# Altium PCB MB_v3.PcbDoc (part 11 of 11)
Units mm, origin at the board's own origin, x right, y up, seen from the top; angles counter-clockwise.
Board outline 203 x 72 mm, 6 copper layers (Top Layer, Layer 3, Layer 1, Layer 2, Layer 4, Bottom Layer), stack 1.52 mm thick; 726 components, 608 nets, 3144 pads, 2508 vias.
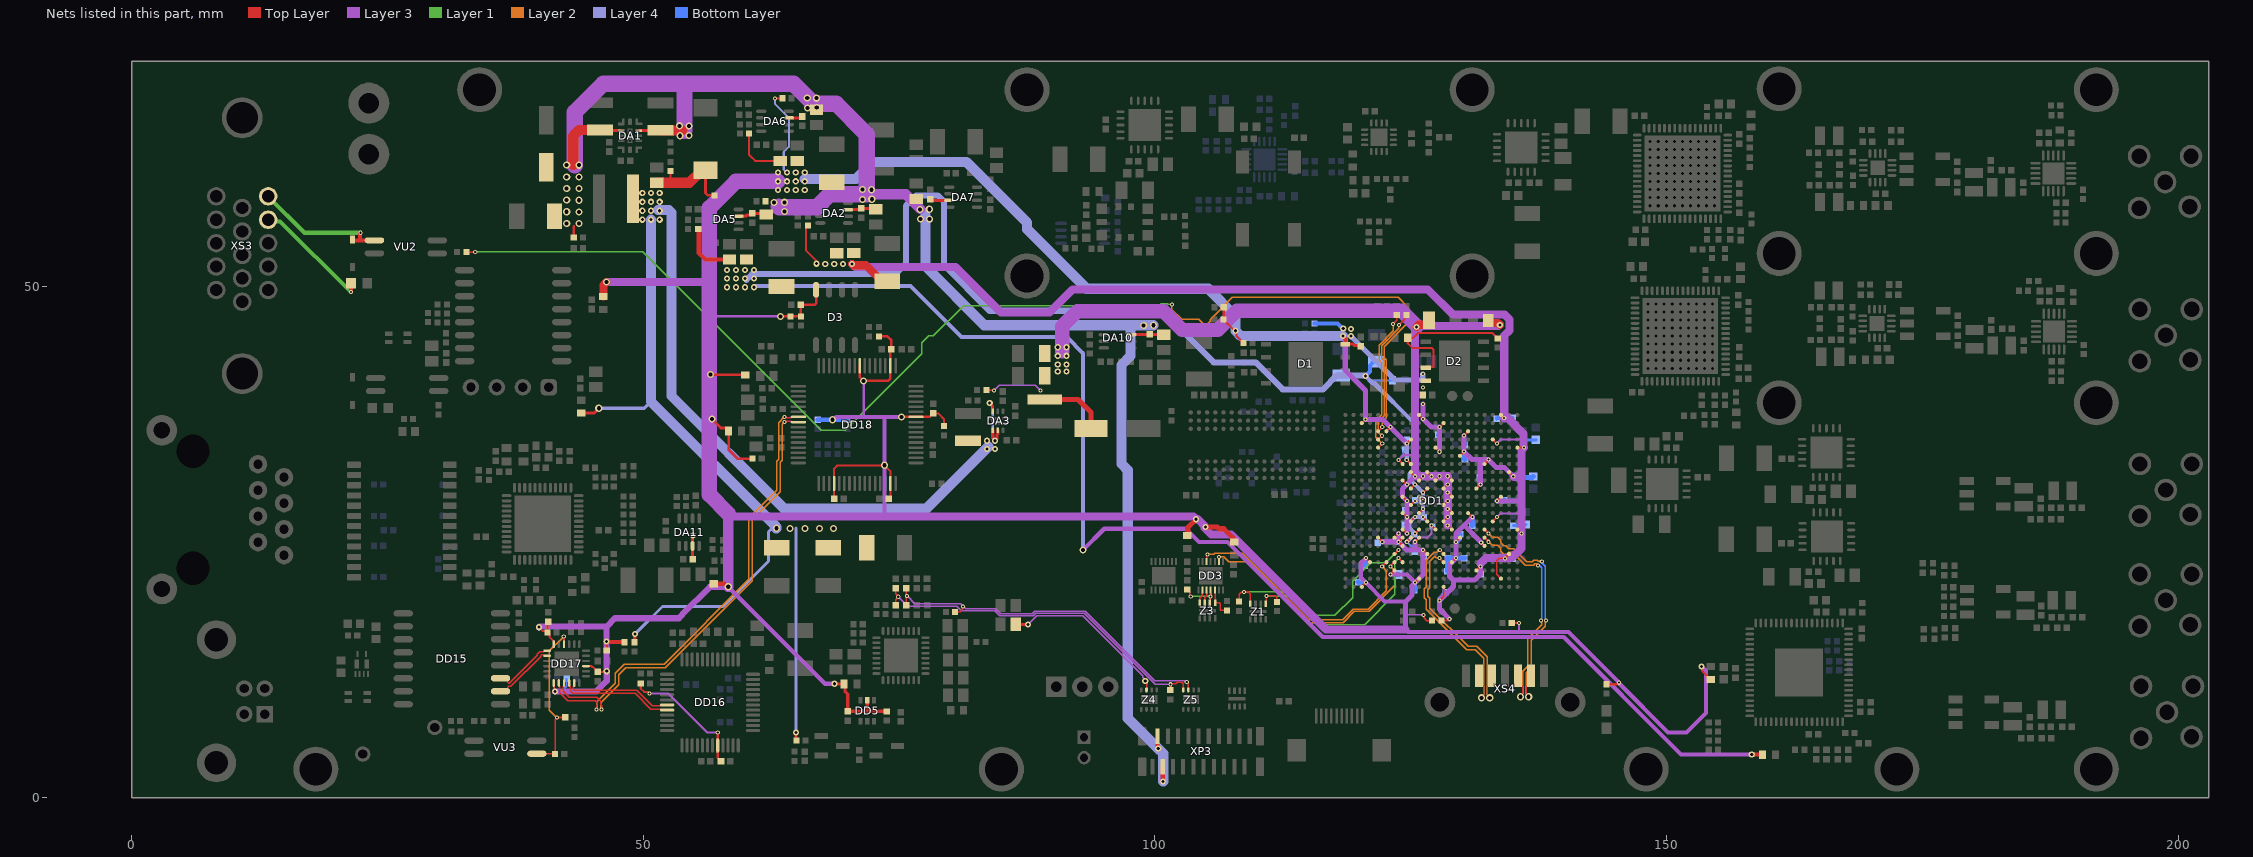
[diagram p13: the nets of this part, all layers, seen from the top]

## Via types
v1: diameter 0.8, hole 0.4, Top Layer to Bottom Layer, tented both sides, 1056 vias
v2: diameter 0.4, hole 0.2, Top Layer to Bottom Layer, tented both sides, 707 vias
v3: diameter 0.6, hole 0.3, Top Layer to Bottom Layer, tented both sides, 364 vias
v4: diameter 0.7, hole 0.4, Top Layer to Bottom Layer, tented both sides, 223 vias
v5: diameter 0.8, hole 0.4, Top Layer to Bottom Layer, 52 vias
v6: diameter 0.9, hole 0.5, Top Layer to Bottom Layer, 45 vias
v7: diameter 0.66, hole 0.4, Top Layer to Bottom Layer, 25 vias
v8: diameter 0.7, hole 0.3, Top Layer to Bottom Layer, 13 vias
v9: diameter 0.5, hole 0.2, Top Layer to Bottom Layer, 12 vias
v10: diameter 0.5, hole 0.3, Top Layer to Bottom Layer, 5 vias
v11: diameter 1, hole 0.5, Top Layer to Bottom Layer, 2 vias
v12: diameter 0.4, hole 0.2, Top Layer to Bottom Layer, 2 vias
v13: diameter 0.9, hole 0.4, Top Layer to Bottom Layer, tented both sides, 2 vias

## Nets (pads, with @x,y where several pads share a name; then routed paths per layer and width w, separated by ;. In a path a pad name is that pad's centre, name@x,y a point inside that pad or via, vN(x,y) a via of type N, cw(c..) or ccw(c..) an arc to the next point about the centre after c; other vN are vias at no path point) (continued)
REGV: C251.2 DD16.8 R10.2 | length 12.7
  Top Layer w0.2: R10.2@49.75,11.175 49.75,10.675 50.075,10.35 50.425,10.35 v2@50.6,10.175 ; v2(57.275,6.375) DD16.8@57.275,5.125 57.275,3.89 C251.2@57.59,3.575
  Layer 3 w0.2: v2(50.6,10.186) 52.464,10.186 56.275,6.375 v2(57.275,6.375)
RHP: C355.1 Z4.3 | length 16.7
  Top Layer w0.125: v3(99.052,11.414) 99.052,11.286 99.175,11.163 Z4.3@99.175,10.55
  Top Layer w0.3: C355.1@86.4,16.95 v3(87.6,16.95)
  Layer 3 w0.125: v3(87.6,16.95) 88.45,17.8 92.944,17.8 98.802,11.942 98.802,11.793 99.052,11.543 v3(99.052,11.414)
RMICN: C345.1 C364.2 R173.2 Z5.4 | length 34.8
  Top Layer w0.125: C364.2@74.675,20.49 74.675,19.961 74.913,19.723 v2(74.913,19.65) 74.913,19.576 74.68,19.343 C345.1@74.68,18.825 ; R173.2@101.5,10.525 101.525,10.55 v2(101.525,11.097) 101.578,11.15 102.025,11.15 102.175,11.3 102.6,11.3 102.775,11.125 Z5.4@102.775,10.55
  Layer 3 w0.125: v2(74.913,19.65) 75.837,18.725 80.618,18.725 81.068,18.275 84.35,18.275 84.837,17.787 88.119,17.787 88.357,18.025 93.095,18.025 100.017,11.103 101.519,11.103 v2(101.525,11.097)
RMICP: C344.1 C363.2 R171.2 Z5.3 | length 34.7
  Top Layer w0.125: C363.2@75.675,20.49 75.675,19.899 75.775,19.799 v2(75.775,19.725) 75.775,19.651 75.696,19.572 C344.1@75.696,18.825 ; R171.2@80.475,18.175 80.95,18.175 81.186,18.411 81.186,18.627 v2(81.239,18.68) ; v2(103.107,11.322) 103.107,11.248 103.275,11.08 Z5.3@103.275,10.55
  Layer 3 w0.125: v2(75.775,19.725) 76.538,18.962 81.029,18.962 81.239,18.752 v2(81.239,18.68) ; v2@81.275,18.716 81.277,18.716 81.494,18.5 84.443,18.5 84.931,18.012 88.026,18.012 88.264,18.25 93.189,18.25 99.979,11.46 102.896,11.46 103.034,11.322 v2(103.107,11.322)
RS422_RX: DD1.W7 DD3.2 | length 24.5
  Top Layer w0.125: DD3.2@106.247,23.095 106.254,23.102 106.254,23.53 v2(106.262,23.538)
  Top Layer w0.2: v2(123.011,22.624) DD1.W7@123.412,23.025
  Layer 2 w0.125: v2(106.262,23.538) 106.725,23.538 107.209,23.055 109.034,23.055 114.964,17.125 118.396,17.125 119.496,18.225 120.925,18.225 123.5,20.8 123.5,22.134 v2(123.011,22.624)
RS422_TX: DD1.W6 DD3.5 | length 25.2
  Top Layer w0.125: DD3.5@105.047,23.095 105.047,23.598 105.15,23.701 v2(105.15,23.775)
  Top Layer w0.2: v2(122.211,22.624) DD1.W6@122.612,23.025
  Layer 2 w0.125: v2(105.15,23.775) 105.175,23.8 105.768,23.8 105.868,23.9 108.535,23.9 115.047,17.388 118.341,17.388 119.403,18.45 120.825,18.45 122.625,20.25 122.625,22.209 v2(122.211,22.624)
RS422A: DD3.12 R35.1 Z3.5 | length 3
  Top Layer w0.125: DD3.12@105.847,20.305 105.875,20.277 Z3.5@105.875,19.065 106.268,19.065 106.375,18.958 106.375,18.4 106.45,18.325 R35.1@107.025,18.325
RS422B: DD3.11 R36.2 Z3.6 | length 4
  Top Layer w0.125: R36.2@103.161,20.361 103.398,20.124 103.398,19.864 103.5,19.762 v2(103.5,19.688) ; Z3.6@105.375,19.065 105.4,19.09 105.4,19.663 v2(105.425,19.688) ; v2@105.436,19.688 105.436,20.294 DD3.11@105.447,20.305
  Layer 1 w0.125: v2(103.5,19.688) v2(105.425,19.688)
RS422Y: DD3.9 Z3.8 | length 1.4
  Top Layer w0.125: Z3.8@104.375,19.065 104.394,19.084 104.394,19.494 104.647,19.747 DD3.9@104.647,20.305
RS422Z: DD3.10 Z3.7 | length 1.3
  Top Layer w0.125: Z3.7@104.875,19.065 104.875,19.554 105.047,19.726 DD3.10@105.047,20.305
SERCLK_N: DD1.T18 XS4.5 | length 23
  Top Layer w0.125: XS4.5@135.49,11.95 135.49,11.25 135.828,10.912 135.889,10.912 135.963,10.839 135.963,10.236 135.725,9.998 v4(135.725,9.875)
  Top Layer w0.2: DD1.T18@132.212,25.425 v2(132.613,25.024)
  Layer 2 w0.125: v2(132.613,25.024) 132.976,24.661 133.489,24.661 133.782,24.368 133.782,24.106 134.075,23.812 134.375,23.812 134.577,24.015 134.938,24.015 136.203,22.75 137.01,22.75 137.136,22.876 137.239,22.876 137.39,22.725 v2(137.45,22.725) ; v4(135.725,9.875) 135.725,9.998 135.963,10.236 135.963,12.373 136.45,12.861 136.45,15.55 137.813,16.912 137.813,17.176 137.725,17.263 v2(137.725,17.337)
  Bottom Layer w0.125: v2(137.45,22.725) 137.503,22.672 137.626,22.672 137.813,22.486 137.813,19.951 v2@137.813,17.499
SERCLK_P: DD1.R18 XS4.6 | length 23.6
  Top Layer w0.125: v4(136.525,9.875) 136.525,9.998 136.288,10.236 136.288,10.839 136.361,10.912 136.423,10.912 136.76,11.25 XS4.6@136.76,11.95
  Top Layer w0.2: DD1.R18@132.212,26.225 v2(132.613,25.824)
  Layer 2 w0.125: v2(132.613,25.824) 132.979,25.458 133.489,25.458 133.792,25.155 133.792,24.936 134.09,24.638 134.275,24.638 134.573,24.34 135.073,24.34 136.337,23.075 136.875,23.075 137.001,23.201 137.374,23.201 137.444,23.131 137.751,23.131 v2(137.804,23.079) ; v4(136.525,9.875) 136.525,9.998 136.288,10.236 136.288,12.239 136.775,12.727 136.775,15.415 138.138,16.778 138.138,17.176 138.225,17.263 v2(138.225,17.337)
  Bottom Layer w0.125: v2(137.804,23.079) 137.856,23.026 137.856,22.902 138.138,22.621 138.138,19.817 v2@138.138,17.499
SERDATA_N: DD1.W13 XS4.3 | length 20.7
  Top Layer w0.125: v4(132.715,9.775) 132.715,9.898 132.477,10.136 132.477,10.839 132.551,10.912 132.613,10.912 132.95,11.25 XS4.3@132.95,11.95
  Top Layer w0.2: v2(127.811,23.426) DD1.W13@128.212,23.025
  Layer 2 w0.125: v2(127.811,23.426) 127.758,23.479 127.494,23.479 127.36,23.612 126.85,23.102 126.85,20.514 126.652,20.316 126.652,19.694 126.85,19.497 126.85,18.55 130.6,14.8 131.46,14.8 132.477,13.782 132.477,10.136 132.715,9.898 v4(132.715,9.775)
SERDATA_P: DD1.V13 XS4.2 | length 21.3
  Top Layer w0.125: XS4.2@131.68,11.95 131.68,11.25 132.018,10.912 132.079,10.912 132.152,10.839 132.152,10.136 131.915,9.898 v4(131.915,9.775)
  Top Layer w0.2: v2(127.837,24.226) 127.837,24.213 128.212,23.838 DD1.V13@128.212,23.825
  Layer 2 w0.125: v2(127.837,24.226) 127.763,24.226 127.533,23.997 127.285,23.997 126.525,23.237 126.525,20.648 126.327,20.45 126.327,19.56 126.525,19.362 126.525,18.415 130.465,14.475 131.325,14.475 132.152,13.648 132.152,10.136 131.915,9.898 v4(131.915,9.775)
TUNE: DD1.C5 R39.1 | length 121.2
  Top Layer w0.125: R39.1@32.708,53.34 33.565,53.34 v2(33.575,53.35)
  Top Layer w0.2: DD1.C5@121.812,35.825 v2(122.213,36.226)
  Layer 1 w0.125: v2(33.575,53.35) 49.963,53.35 67.388,35.925 69.75,35.925 77.2,43.375 77.2,44.456 77.882,45.138 78.353,45.138 81.323,48.108 100.445,48.108 100.613,48.275 101.213,48.275 101.267,48.221 v2(101.663,48.221)
  Layer 2 w0.125: v2(101.663,48.221) 101.65,48.208 101.65,47.719 102.595,46.775 104.3,46.775 104.787,46.287 105.117,46.287 105.388,46.558 105.388,46.744 107.544,48.9 123.757,48.9 124.713,47.944 124.713,46.418 122.387,44.093 122.387,43.032 122.625,42.794 122.625,37.15 122.213,36.738 v2(122.213,36.226)
TUNE_OUT_N: DA9.2 VU2.3 XS3.5 | length 13.4
  Top Layer w0.4: DA9.2@21.59,54.563 21.59,54.533 21.64,54.483 22.3,54.483 ; v2(22.35,55.225) 22.3,55.175 22.3,54.483 ; VU2.3@23.722,54.483 22.3,54.483
  Layer 1 w0.4: XS3.5@13.343,58.785 16.903,55.225 v2(22.35,55.225)
TUNE_OUT_P: F3.1 XS3.4 | length 11.9
  Top Layer w0.4: v2(21.425,49.425) 21.425,50.282 F3.1@21.435,50.292
  Layer 1 w0.4: XS3.4@13.343,56.495 13.498,56.34 14.51,56.34 v2(21.425,49.425)
TX_FAIL: DD1.V7 R30.2 Z1.8 | length 23.2
  Top Layer w0.125: R30.2@108.225,19.175 108.225,19.904 108.424,20.103 108.678,20.103 v2(108.7,20.125) 109.125,20.125 109.325,19.925 Z1.8@109.325,18.975
  Top Layer w0.2: DD1.V7@123.412,23.825 v2(123.813,24.226)
  Layer 1 w0.125: v2(108.7,20.125) 113.35,20.125 115.637,17.838 117.588,17.838 119.315,19.565 119.315,21.19 121.111,22.986 122.573,22.986 v2(123.813,24.226)
TX_ON: DD1.W8 R29.2 Z1.5 | length 21.6
  Top Layer w0.125: Z1.5@110.825,18.975 110.868,19.018 110.868,19.668 v2(110.911,19.711) v2@110.925,19.725 ; v2@111.025,19.825 v2@110.925,19.725 ; R29.2@111.925,19.15 111.925,19.6 111.753,19.772 111.415,19.772 111.368,19.725 v2@110.925,19.725
  Top Layer w0.2: v2(123.811,23.426) DD1.W8@124.212,23.025
  Layer 1 w0.125: v2(110.911,19.711) 113.324,19.711 116.107,16.928 120.488,16.928 123.448,19.888 123.448,23.064 v2(123.811,23.426)
USBD1_N: DD17.2 DD18.7 | length 45.6
  Top Layer w0.125: DD17.2@41.75,11.225 41.75,10.932 41.837,10.844 41.837,10.29 42.628,9.5 45.307,9.5 45.513,9.294 45.513,9.096 45.425,9.009 v2(45.425,8.65) ; v2(63.8,37.225) 63.874,37.225 63.962,37.138 64.404,37.138 64.491,37.225 DD18.7@65.15,37.225
  Layer 2 w0.125: v2(45.425,8.65) 45.425,8.724 45.513,8.812 45.513,9.441 47.275,11.203 47.275,12.185 48.14,13.05 52.025,13.05 60.325,21.35 60.325,27.325 63.037,30.037 63.037,32.913 63.238,33.113 63.238,36.675 63.787,37.225 v2(63.8,37.225)
USBD1_P: DD17.3 DD18.8 | length 45
  Top Layer w0.125: DD17.3@42.25,11.225 42.25,10.932 42.162,10.844 42.162,10.425 42.763,9.825 45.441,9.825 45.838,9.429 45.838,9.096 45.925,9.009 v2(45.925,8.65) ; v2(63.8,36.725) 63.874,36.725 63.962,36.812 64.404,36.812 64.491,36.725 DD18.8@65.15,36.725
  Layer 2 w0.125: v2(45.925,8.65) 45.925,8.724 45.838,8.812 45.838,9.306 47.6,11.069 47.6,12.05 48.275,12.725 52.16,12.725 60.65,21.215 60.65,27.19 63.362,29.903 63.362,32.778 63.563,32.978 63.563,36.518 63.769,36.725 v2(63.8,36.725)
USBD2_N: DD16.44 DD17.4 | length 11.1
  Top Layer w0.125: DD17.4@42.75,11.225 42.75,10.932 42.837,10.844 42.837,10.461 43.101,10.197 49.203,10.197 50.738,8.663 51.64,8.663 51.728,8.575 DD16.44@52.325,8.575
USBD2_P: DD16.43 DD17.5 | length 10.5
  Top Layer w0.125: DD17.5@43.25,11.225 43.25,10.932 43.162,10.844 43.162,10.595 43.236,10.522 49.338,10.522 50.872,8.988 51.64,8.988 51.728,9.075 DD16.43@52.325,9.075
USBD_N: DD15.11 DD17.19 | length 6.2
  Top Layer w0.125: DD15.11@36.043,11.684 36.514,11.684 36.733,11.465 36.733,11.285 36.806,11.211 36.91,11.211 39.634,13.936 39.634,14.024 39.898,14.287 40.219,14.287 40.307,14.375 DD17.19@40.6,14.375
USBD_P: DD15.10 DD17.20 | length 6.4
  Top Layer w0.125: DD15.10@36.043,10.414 DD15.10@36.514,10.414 ; DD15.10@36.703,10.414 DD15.10@36.514,10.414 ; DD17.20@40.6,13.875 40.307,13.875 40.219,13.962 40.032,13.962 39.959,13.889 39.959,13.801 37.045,10.886 36.806,10.886 36.733,10.813 36.733,10.633 DD15.10@36.514,10.414
VBUS_ISO: DD17.16 R168.2 R204.1 VU3.3 | length 15.8
  Top Layer w0.125: VU3.3@39.6,4.315 41.375,4.315 R168.2@41.375,4.3 41.405,4.33 41.405,7.639 41.575,7.81 v2(41.575,7.85)
  Top Layer w0.2: v2(41.575,7.85) 42.35,7.85 R204.1@42.375,7.875 ; v2(42.225,15.75) 42.244,15.731 42.244,15.031 DD17.16@42.25,15.025
  Layer 2 w0.125: v2(41.575,7.85) 41.55,7.85 40.825,8.575 40.825,14.35 v2(42.225,15.75)
VCC_5V0: C128.2 DA11.3 | length 2.4
  Top Layer w0.3: C128.2@54.816,23.299 54.812,23.303 54.812,24.612 DA11.3@54.808,24.616 54.818,24.626 54.818,25.618 v3(54.85,25.65)
VCC_12V0: C1.2 C2.1 C8.2 C9.2 C10.2 C11.2 C15.2 C16.2 C17.2 C72.2 C73.2 C87.2 C88.2 DA1.2 DA1.10 DA2.3 DA5.3 DA6.3 DA7.3 DA10.3 L58.2 R2.2 R182.1 XP3.2 XP3.3 | length 166.5
  Top Layer w0.2: R182.1@43.2,54.75 43.2,55.9
  Top Layer w0.3: C73.2@45.775,65.275 45.85,65.2 DA1.2@47.83,65.2 ; DA1.10@49.57,65.2 51.625,65.2 C72.2@51.675,65.25 ; DA5.3@59.308,56.849 59.647,56.849 59.673,56.875 60.057,56.875 60.123,56.941 60.455,56.941 C15.2@60.625,57.111 61.931,57.111 C8.2@62.022,57.02 ; R2.2@61.922,58.265 R2.2@61.957,58.3 ; DA6.3@64.22,66.447 65.4,66.447 C16.2@65.537,66.584 ; DA2.3@70,57.476 71.182,57.476 C11.2@71.317,57.611 72.623,57.611 C1.2@72.714,57.52 ; C17.2@78.06,58.493 78.16,58.393 79.896,58.393 DA7.3@79.905,58.383 ; DA10.3@97.698,45.266 97.708,45.276 99.455,45.276 C88.2@99.476,45.297 100.83,45.297 C87.2@100.873,45.254
  Top Layer w0.4: XP3.2@100.261,6.034 100.261,4.924 100.323,4.863 v3(100.323,4.809) ; XP3.3@100.761,3.034 100.761,1.693 100.8,1.654 v3(100.8,1.6)
  Top Layer w1: 43.148,61.85 43.148,64.689 43.734,65.275 C73.2@45.775,65.275 ; C72.2@51.675,65.25 51.7,65.225 53.775,65.225
  Layer 3 w1: 63.232,57.775 63.382,57.775 ; 72.307,58.975 75.65,58.975 v4@77.087,57.537
  Layer 3 w1.6: 43.3,61.836 43.3,67 46.075,69.775 54.025,69.775 ; 54.025,65.2 54.025,69.775 ; 63.232,57.775 63.282,57.725 66.975,57.725 68.225,58.975 71.807,58.975 71.821,58.989 71.821,64.854 68.85,67.825 66.5,67.825 66.5,67.95 64.675,69.775 54.025,69.775
  Layer 4 w1: 77.585,56.95 77.585,51.93 83.327,46.187 97.475,46.187 ; v4(99.85,46.187) 97.475,46.187 ; v3(100.8,1.6) 100.8,4.331 v3(100.323,4.809) 97.35,7.781 97.35,32.025 96.73,32.645 96.73,42.303 97.603,43.175 97.603,46.06 97.475,46.187
  other v4: 98.9,46.175 42.512,56.134 43.7,56.123 77.975,56.55 77.075,56.575 43.7,57.261 42.512,57.272 63.782,57.3 77.05,57.5 77.95,57.525 62.782,58.175 63.807,58.2 43.7,58.4 42.512,58.411 71.432,58.475 72.332,58.5 72.307,59.425 71.407,59.45 42.512,59.55 43.7,59.539 42.512,60.688 43.7,60.677 42.512,61.836 43.7,61.825 53.575,64.7 54.475,64.725 54.45,65.65 53.55,65.675 66.05,67.425 66.95,67.45 66.925,68.375 66.025,68.4
VDD_1V0: C19.2 C25.1 C42.2 C45.2 C47.2 C49.2 C51.2 C53.2 C55.2 C56.2 C60.2 C61.2 C63.2 DD1.G8 DD1.H9 DD1.H11 DD1.J8 DD1.J10 DD1.J12 DD1.J14 DD1.K13 DD1.L8 DD1.L14 DD1.M13 DD1.N8 DD1.N14 DD1.P13 DD1.R8 DD1.R14 L67.2 R4.1 | length 106.2
  Top Layer w0.125: R4.1@83.525,39.85 83.55,39.825 v2(84.275,39.825)
  Top Layer w0.2: v2(123.811,33.026) DD1.G8@124.212,32.625 ; DD1.R8@124.212,26.225 v2(124.613,25.824) ; DD1.N8@124.212,27.825 v2(124.613,27.424) ; DD1.L8@124.212,29.425 v2(124.613,29.024) ; DD1.J8@124.212,31.025 v2(124.613,30.624) ; DD1.H9@125.012,31.825 v2(125.413,31.424) ; DD1.J10@125.812,31.025 v2(126.213,31.426) ; DD1.H11@126.612,31.825 v2(127.013,31.424) ; DD1.J12@127.412,31.025 v2(127.813,31.426) ; DD1.P13@128.212,27.025 v2(128.613,27.426) ; DD1.M13@128.212,28.625 v2(128.613,29.026) ; DD1.K13@128.212,30.225 v2(128.613,30.626) ; v2(128.611,26.626) DD1.R14@129.012,26.225 ; v2(128.611,28.226) DD1.N14@129.012,27.825 ; v2(128.611,29.826) DD1.L14@129.012,29.425 ; v2(128.611,31.426) DD1.J14@129.012,31.025
  Top Layer w0.5: L67.2@89.225,38.935 92.49,38.935 93.75,37.675 C25.1@93.75,36.1
  Top Layer w0.8: v3(125.576,46.024) 125.777,46.225 126.6,46.225 126.775,46.4 C45.2@126.775,46.675 ; C49.2@132.575,46.65 132.575,46.5 132.675,46.4 133.525,46.4 v3(133.7,46.225)
  Layer 3 w0.125: v2(84.275,39.825) 84.788,40.338 88.287,40.338 v2(88.8,39.825)
  Layer 3 w0.2: v2(123.811,33.026) 123.813,33.026 124.287,33.5 125.223,33.5 125.413,33.31
  Layer 3 w0.5: v2(124.613,25.824) v2(124.613,27.424) v2(124.613,29.024) 124.175,29.462 124.175,30.185 v2(124.613,30.624) v2(125.413,31.424)
  Layer 3 w0.6: v2@128.611,29.024 v2(128.613,29.026) ; v2(128.611,31.426) v2@128.613,31.424
  Layer 3 w0.8: 125.4,38.2 125.4,45.848 v3(125.576,46.024) ; 125.413,38.187 125.413,33.31 v2(125.413,31.424) v2@126.211,31.424 ; v3@125.576,46.101 133.576,46.101 v3(133.7,46.225) ; v2@126.216,31.424 v2(127.013,31.424) ; v2@127.013,31.426 v2(127.813,31.426) v2(128.611,31.426) ; v2(128.611,26.626) v2(128.611,28.226) v2@128.611,29.024 ; v2(128.613,29.026) v2(128.613,30.626) v2@128.613,31.424
  Layer 3 w1.4: 90.95,43.65 90.95,46.075 92.425,47.55 100.838,47.55 102.663,45.725 106.15,45.725 108.013,47.588 124.088,47.588 v3@125.576,46.101
  Bottom Layer w0.2: v2(123.811,33.026) 124.305,33.521 124.305,33.815 C63.2@124.49,34
  Bottom Layer w0.3: C60.2@124.49,28.215 124.613,28.092 v2(124.613,27.424) ; C56.2@124.494,26.65 124.613,26.531 v2(124.613,25.824)
  other v3: 90.5,41.662 91.35,41.662 90.5,42.362 91.35,42.362 90.5,43.2 91.35,43.2 90.5,44.037 91.35,44.037
VDD_1V8: C33.2 C39.2 C48.2 C50.2 C57.2 C59.2 C62.2 C64.2 DD1.K9 DD1.K11 DD1.L10 DD1.M9 DD1.N10 DD1.P9 DD1.P11 DD1.R10 DD1.T9 L4.2 L8.1 L46.1 R13.2 | length 250.3
  Top Layer w0.2: v2(124.611,25.024) DD1.T9@125.012,25.425 ; DD1.P9@125.012,27.025 v2(125.413,27.426) ; DD1.M9@125.012,28.625 v2(125.413,29.026) ; DD1.K9@125.012,30.225 v2(125.413,30.626) ; v2(125.411,25.824) DD1.R10@125.812,26.225 ; DD1.N10@125.812,27.825 v2(126.213,28.226) ; DD1.L10@125.812,29.425 v2(126.213,29.024) ; v2(126.211,27.426) DD1.P11@126.612,27.025 ; v2(126.212,29.825) DD1.K11@126.612,30.225 DD1.K11@126.613,30.226
  Top Layer w0.4: R13.2@55.418,55.312 55.418,53.264 56.083,52.599 C39.2@58.427,52.599 ; v3(158.326,4.225) L46.1@159.375,4.225
  Layer 3 w0.4: v4(92.975,24.225) 95.045,26.295 103.005,26.295 104.3,25 107.1,25 116.4,15.7 139.95,15.7 151.425,4.225 v3(158.326,4.225)
  Layer 4 w0.2: v2(125.413,29.026) v2@125.415,29.025 ; v2(126.211,27.426) v2@126.212,27.428 ; v2@126.212,28.225 v2(126.213,28.226)
  Layer 4 w0.4: v3(60.807,49.9) 60.932,50.025 76.1,50.025 81.098,45.027 91.393,45.027 92.975,43.444 v4(92.975,24.225) ; v3(120.58,41.219) 121.282,40.517 121.433,40.517 125.275,36.675 125.275,32.075 124.875,31.675 124.875,31.165 v2(125.413,30.626) 126.212,29.828 v2(126.212,29.825) v2(126.213,29.024) ; v2(124.611,25.024) v2(125.411,25.824) 124.869,26.365 124.869,26.891 v2@125.404,27.426 ; v2(125.413,27.426) v2@125.404,27.426 ; v2@125.415,29.025 v2(126.213,29.024) ; v2(126.211,27.426) v2@125.404,27.426 ; v2@126.212,27.428 v2@126.212,28.225 ; v2(126.213,28.226) v2(126.213,29.024) v2(126.213,29.024)
  Layer 4 w0.6: v3@60.082,50.613 60.653,51.183 74.633,51.183 75.654,52.204 75.654,57.849 76.675,58.869 78.76,58.869 79.4,58.23 79.4,52.025 83.825,47.6 100.69,47.6 105.74,42.55 109.843,42.55 112.483,39.91 116.425,39.91 117.79,41.275 120.524,41.275 v3(120.58,41.219)
  Bottom Layer w0.2: v3(120.58,41.219) 120.642,41.219 121.035,40.826 121.177,40.826 121.203,40.8 L8.1@123.195,40.8 ; v2(124.611,25.024) 125.011,24.624 125.293,24.624 125.411,24.506 125.411,24.08 C62.2@125.402,24.072
  Bottom Layer w0.4: C50.2@118.2,41.275 118.228,41.247 120.552,41.247 v3(120.58,41.219) ; v3@120.58,41.275 120.621,41.275 121,41.654 121,42.25 121.375,42.625 C48.2@121.65,42.625
  other v3: 58.182,49.9 59.057,49.9 59.932,49.9 58.182,50.75 59.057,50.75 59.932,50.75 60.807,50.75 58.182,51.6 59.057,51.6 59.932,51.6 60.807,51.6
VDD_2V5: C30.2 C36.2 C134.2 C135.2 C138.2 C139.2 C142.2 C143.2 C145.2 C147.2 C148.2 C149.2 C150.2 C151.2 C152.2 C153.2 C154.2 C156.2 C157.2 C158.2 C159.2 C160.2 C161.2 DD1.A20 DD1.AA20 DD1.AB13 DD1.C16 DD1.D19 DD1.E22 DD1.F15 DD1.G18 DD1.H21 DD1.K17 DD1.L20 DD1.N16 DD1.P19 DD1.R22 DD1.T15 DD1.U18 DD1.V21 DD1.W14 DD1.Y17 L1.2 R7.2 R61.2 | length 175.2
  Top Layer w0.125: v2(127.817,19.292) 128.212,19.687 DD1.AB13@128.212,20.625 ; DD1.AA20@133.807,21.425 133.4,21.832 133.4,23.161 133.651,23.413 134.197,23.413 v2(134.211,23.399)
  Top Layer w0.2: R7.2@66.11,55.939 65.91,55.739 65.91,55.65 65.882,55.622 65.882,53.5 66.932,52.45 v3(66.932,52.2) ; R61.2@128,17.325 128.608,17.325 128.746,17.462 v2(128.8,17.462) ; DD1.W14@129.012,23.025 v2(129.413,23.426) ; v2(129.425,25) 129.425,25.019 129.812,25.406 DD1.T15@129.812,25.425 ; DD1.F15@129.812,33.425 v2(130.213,33.826) ; v2@130.213,35.425 DD1.C16@130.612,35.825 ; DD1.N16@130.612,27.825 v2(131.013,27.424) ; DD1.Y17@131.412,22.225 v2(131.813,22.626) ; DD1.K17@131.412,30.225 v2(131.813,30.626) ; v2(131.885,24.952) DD1.U18@132.212,24.625 ; DD1.G18@132.212,32.625 132.212,32.643 132.613,33.045 v2(132.613,33.063) ; DD1.P19@133.012,27.025 v2(133.413,27.426) ; DD1.D19@133.012,35.025 v2(133.413,34.624) ; v2(133.411,29.024) DD1.L20@133.812,29.425 ; DD1.A20@133.812,37.425 v2(134.132,37.105) ; v2(134.211,23.399) 134.211,23.424 DD1.V21@134.612,23.825 ; DD1.H21@134.612,31.825 v2(135.013,31.424) ; DD1.R22@135.412,26.225 v2(135.813,25.824) ; DD1.E22@135.412,34.225 v2(136.075,34.225)
  Top Layer w0.8: v3(70.407,52.175) 70.534,52.048 71.752,52.048 72.975,50.825 73.507,50.825 L1.2@73.857,50.475
  Layer 3 w0.2: v2(133.413,27.426) 133.762,27.775 135.813,27.775 ; v2(133.413,34.624) 133.813,35.024 135.179,35.024 135.19,35.034 135.981,35.034 136.025,34.99
  Layer 3 w0.5: v2(128.8,17.462) 127.817,18.445 v2(127.817,19.292) 129.189,20.664 129.189,21.274 ; v2(130.213,35.424) v2(130.213,35.424) v2(130.213,33.826) 130.977,33.063 131.795,33.063 ; v2(131.013,27.424) 130.219,26.629 ; v2(131.813,22.626) 131.813,21.846 131.241,21.274 129.189,21.274 ; v2(131.813,30.626) 131.795,30.644 131.795,33.063 ; v2(131.885,24.952) 131.885,24.964 130.219,26.629 ; v2(133.411,29.024) 135.8,29.024 ; v2(135.013,31.424) 134.137,32.3 133.325,32.3 132.613,33.011 v2(132.613,33.063) 131.795,33.063 ; 129.189,21.274 128.775,21.687 128.775,22.788 v2(129.413,23.426) 129.413,24.988 v2(129.425,25) 129.425,25.835 130.219,26.629
  Layer 3 w0.8: v3(70.407,52.175) 70.707,51.875 80.499,51.875 84.949,47.425 89.7,47.425 91.963,49.688 126.662,49.688 129.125,47.225 134.181,47.225 134.65,46.756 134.65,45.675 134.132,45.157 v2(134.132,37.105) 134.495,37.105 136.025,35.575 136.025,34.99 v2@136.025,34.275 ; 131.813,22.88 132.357,23.424 134.186,23.424 v2(134.211,23.399) ; v2@134.211,23.424 134.856,23.424 135.813,24.381 v2(135.813,25.824) 135.813,27.775 135.813,33.963 v2(136.075,34.225) ; v2@135.062,31.375 135.733,31.375
  Bottom Layer w0.3: v2(131.813,22.626) 131.825,22.615 C134.2@131.825,21.87 ; C138.2@133.383,37.037 C138.2@133.45,37.105 ; C150.2@133.509,23.37 133.537,23.399 v2(134.211,23.399) 134.951,23.399 C143.2@134.98,23.37 ; C142.2@134.92,37.105 C142.2@134.95,37.135 ; C152.2@135.024,26.61 135.569,26.61 ; 135.569,26.613 135.569,26.61 ; v2(135.813,25.824) 135.569,26.068 135.569,26.61 ; v2(136.075,34.225) 136.075,34.94 C149.2@136.025,34.99 137.215,34.99 C161.2@137.225,35 ; C160.2@136.25,26.72 136.139,26.61 135.569,26.61
  Bottom Layer w0.4: v2(127.817,19.292) 127.817,19.497 C153.2@128.413,20.092 ; C156.2@130.213,33.147 v2(130.213,33.826) ; C159.2@130.213,34.673 v2(130.213,35.424) ; C138.2@133.45,37.105 v2(134.132,37.105) C142.2@134.92,37.105
  Bottom Layer w0.5: C148.2@128.575,22.135 128.588,22.148 128.588,23.4 C135.2@128.6,23.413 128.614,23.426 v2(129.413,23.426) 130.216,23.426 C139.2@130.225,23.435 ; v2(129.425,25) 129.742,25.317 129.742,25.695 C147.2@129.812,25.765 ; C156.2@130.213,33.147 C156.2@130.275,33.085 ; C159.2@130.213,34.673 C159.2@130.285,34.6 ; C158.2@131,26.61 131.013,26.624 v2(131.013,27.424) ; C151.2@131.754,31.303 131.795,31.261 131.795,30.645 v2(131.813,30.626) ; v2(133.411,29.024) 133.752,29.024 133.759,29.03 134.045,29.03 C157.2@134.115,29.1 ; v2(135.013,31.424) 135.462,31.424 C154.2@135.825,31.061 136.079,31.315 136.877,31.315 C145.2@136.975,31.413
  other v3: 67.782,52.175 68.657,52.175 69.532,52.175
VDD_3V3: C32.2 C34.2 C38.2 C40.2 C66.2 C68.2 C69.2 C71.2 C75.2 C81.2 C111.2 C132.2 C133.2 C136.2 C140.2 C144.2 C335.2 C340.2 C343.2 C360.2 C361.2 D1.8 D2.7 D2.8 D3.8 DD1.A10 DD1.AA10 DD1.AB3 DD1.B3 DD1.B13 DD1.C6 DD1.D9 DD1.E12 DD1.G9 DD1.R12 DD1.T5 DD1.T7 DD1.T8 DD1.T10 DD1.U8 DD1.V11 DD1.W4 DD1.Y7 DD5.5 DD17.1 DD17.9 DD17.18 DD18.20 DD18.31 DD18.42 DD18.50 DD18.56 L5.2 L9.1 L11.1 L12.1 L13.1 L17.1 L48.1 L60.1 L69.2 L70.2 R15.2 R20.1 R21.1 R22.2 R23.1 R24.1 R25.1 R26.1 R27.2 R28.2 R31.1 R32.1 R37.2 R59.2 R162.2 R163.2 R165.2 R172.2 R196.2 R199.2 R200.2 R201.2 R202.2 | length 492.9
  Top Layer w0.125: v2(126.25,17.875) 126.25,17.625 126.55,17.325 R24.1@127.075,17.325
  Top Layer w0.2: v3(39.8,16.675) 40.18,16.295 40.505,16.295 R165.2@40.625,16.175 ; C111.2@40.7,17.215 40.625,17.14 R165.2@40.625,16.175 ; DD17.1@41.25,11.225 41.256,11.219 41.256,10.624 41.369,10.511 v3(41.369,10.402) ; DD17.18@41.25,15.025 41.25,15.298 41.235,15.313 41.235,15.315 40.812,15.738 40.812,15.988 R165.2@40.625,16.175 ; DD17.9@44.4,12.875 44.925,12.875 45,12.8 45.06,12.8 C32.2@45.55,12.31 46.36,12.31 v3(46.425,12.375) ; R163.2@46.425,14.4 v3@46.425,15.25 ; R15.2@60.33,64.91 60.35,64.89 60.35,62.825 60.93,62.245 C40.2@63.386,62.245 ; v2(62.875,68.35) 62.887,68.362 R28.2@63.592,68.362 ; C361.2@68.665,29.25 68.65,29.265 DD18.20@68.65,30.725 68.65,32.175 68.975,32.5 v4(73.575,32.5) 74.15,31.925 DD18.31@74.15,30.725 74.15,29.425 C343.2@73.975,29.25 ; C360.2@78.325,37.59 78.349,37.566 78.828,37.566 79.375,37.019 R162.2@79.375,36.325 ; R32.1@106.725,47.95 106.725,46.766 R31.1@106.7,46.741 107.791,45.65 v3(107.875,45.65) 107.952,45.573 107.952,45.148 R22.2@108.65,44.45 ; DD1.AB3@120.212,20.625 v2(120.613,21.026) ; DD1.B3@120.212,36.625 DD1.B3@120.212,36.625 120.575,36.986 v2(120.577,36.986) ; v2(120.611,23.426) DD1.W4@121.012,23.025 ; DD1.T5@121.81,25.423 v2(122.212,25.022) ; DD1.C6@122.612,35.825 v2(123.013,36.226) ; v2(123.011,21.824) DD1.Y7@123.412,22.225 ; DD1.T7@123.412,25.425 v2(123.813,25.826) ; v2(123.811,25.024) v2@123.814,25.027 ; v2@123.813,25.028 v2@123.814,25.027 ; DD1.T8@124.212,25.425 v2@123.814,25.027 ; DD1.U8@124.214,24.627 v2@123.814,25.027 ; v2(124.61,33.026) DD1.G9@125.012,32.625 ; v2(124.611,34.624) DD1.D9@125.012,35.025 ; v2(125.411,25.024) DD1.T10@125.812,25.425 ; v2(125.423,21.029) 125.812,21.418 DD1.AA10@125.812,21.425 ; DD1.A10@125.812,37.425 v2(126.213,37.024) ; v2(126.213,24.228) DD1.V11@126.614,23.827 ; D2.7@126.468,42.037 126.525,42.094 127.176,42.094 127.225,42.143 127.225,43.8 127.075,43.95 125.175,43.95 124.705,44.42 L9.1@124.705,44.95 125.238,44.95 125.713,45.425 132.97,45.425 R26.1@133.495,44.9 ; v2(127.011,26.626) DD1.R12@127.412,26.225 ; DD1.E12@127.412,34.225 v2(127.813,33.824) ; v2(127.811,36.224) DD1.B13@128.212,36.625 ; R59.2@134.875,17.1 134.9,17.075 v2(135.575,17.075) ; R23.1@144.125,11.1 145.146,11.1 145.296,11.25 v2(145.35,11.25) ; v3(153.425,12.85) 153.454,12.821 153.454,12.431 154.003,11.882 154.003,11.807 154.248,11.562 L48.1@154.323,11.562
  Top Layer w0.25: v4@56.57,41.33 L70.2@59.95,41.33 ; v4(56.7,37.025) 57.58,36.145 58.12,36.145 58.34,35.925 L69.2@58.34,35.85 58.34,34.035 59.225,33.15 R201.2@60.675,33.15 ; v4@63.4,47.05 R202.2@64.375,47.05 R200.2@65.4,47.05 65.393,47.058 65.393,48.168 C335.2@65.385,48.175 66.725,48.175 66.88,48.33 D3.8@66.88,49.65 ; DD18.56@71.15,42.225 71.15,41.125 v4(71.525,40.75) 73.925,40.75 74.15,40.975 DD18.50@74.15,42.225 74.15,43.79 C340.2@74.21,43.85 74.21,44.74 73.85,45.1 R199.2@73.05,45.1 ; v4(75.225,37.225) DD18.42@76.65,37.225 77.96,37.225 C360.2@78.325,37.59
  Top Layer w0.3: v3(68.675,11.15) 68.699,11.126 L60.1@69.605,11.126 69.693,11.038 69.693,10.432 69.977,10.148 C81.2@69.977,8.461 71.877,8.461 ; DD5.5@71.882,9.534 71.882,8.466 71.877,8.461 ; R37.2@73.787,8.451 73.777,8.461 71.877,8.461 ; v3(118.375,45.125) 118.6,44.9 118.6,44.42 118.666,44.354 119.321,44.354 119.45,44.225 120.015,44.225 C66.2@120.125,44.115
  Top Layer w0.4: v3(46.41,15.265) 46.425,15.25 46.443,15.232 48.118,15.232 R172.2@48.15,15.2 ; L17.1@56.655,20.775 56.8,20.92 L17.1@56.875,20.92 57.924,20.92 58.219,20.625 v4(58.3,20.625)
  Top Layer w0.5: L12.1@103.161,25.632 103.209,25.68 103.209,26.409 v3(104.025,27.225) ; v3(104.95,26.463) 106.087,26.463 106.25,26.3 106.725,26.3 107.563,25.462 107.563,25.084 107.658,24.989 L13.1@107.733,24.989
  Top Layer w0.8: L11.1@46.085,48.989 46.105,49.009 46.105,50.13 v4(46.389,50.414)
  Layer 3 w0.125: 124.5,17.775 124.6,17.875 v2(126.25,17.875)
  Layer 3 w0.2: v2(125.411,25.024) 125.811,25.424 126.611,25.424 127.011,25.824 v2(127.011,26.626) ; 135.55,16.2 135.575,16.225 v2(135.575,17.075)
  Layer 3 w0.25: 56.452,47.025 56.469,47.042 v4(63.392,47.042) ; 71.395,37.225 71.525,37.355 v4(71.525,40.75)
  Layer 3 w0.4: v3@46.41,12.39 v3(46.425,12.375) ; v4(58.3,20.625) 67.775,11.15 v3(68.675,11.15) ; v4(68.5,36.95) 68.581,36.95 68.856,37.225 71.395,37.225 73.575,37.225 ; 73.725,27.483 73.575,27.633 73.575,37.225 ; v4(75.225,37.225) 73.575,37.225 ; v2(120.611,23.426) 120.111,22.926 120.111,21.529 v2(120.613,21.026) 122.452,19.188 124.5,19.188 ; v2(123.011,21.824) 124.629,21.824 v2(125.423,21.029) ; 124.5,16.45 124.725,16.225 135.575,16.225 ; 135.55,16.2 140.4,16.2 v2(145.35,11.25) 145.35,11.2 150.15,6.4 151.95,6.4 153.854,8.304 153.854,12.421 v3(153.425,12.85)
  Layer 3 w0.5: 118.6,44.9 118.6,41.775 120.577,39.798 v2(120.577,36.986) 122.254,36.986 v2(123.013,36.226) 124.611,34.629 v2(124.611,34.624) ; v2(122.212,25.022) 123.809,25.022 v2(123.811,25.024) 123.811,25.824 v2(123.813,25.826) ; v2@123.813,25.028 124.613,24.228 125.409,24.228 ; 124.5,16.45 124.5,17.775 124.5,19.188 125.137,19.825 125.137,20.743 v2(125.423,21.029) 126.213,21.818 v2(126.213,24.228) 125.409,24.228 ; v2(125.411,25.024) 125.411,24.23 125.409,24.228 ; v2@126.213,38.472 v2(126.213,37.024) 127.014,36.224 v2(127.811,36.224) 127.813,36.221 v2(127.813,33.824)
  Layer 3 w0.6: v3(39.8,16.675) 39.86,16.735 46.41,16.735 ; v3(41.369,10.402) 43.386,10.402 45.402,10.402 46.425,11.425 v3(46.425,12.375) ; v3@46.41,12.39 v3(46.41,15.265) 46.41,16.735 ; v4(58.3,20.625) 56.525,20.625 53.825,17.925 53.825,17.901 53.474,17.55 47.225,17.55 46.41,16.735
  Layer 3 w0.8: v4(46.389,50.414) 56.441,50.414 56.452,50.425 ; 58.3,27.483 73.725,27.483 103.767,27.483 v3(104.025,27.225) 104.188,27.225 v3(104.95,26.463) ; v3@104.871,26.384 104.871,26.379 105.5,25.75 107.425,25.75 116.725,16.45 124.5,16.45
  Layer 3 w1: v4(58.3,20.625) 58.3,27.483 58.3,27.776
  Layer 3 w1.5: 58.3,27.776 56.452,29.624 56.452,47.025 56.452,50.425 56.452,57.657 59.045,60.25 v3(63.15,60.25)
  Layer 4 w0.2: v2(62.875,68.35) 62.875,67.792 64.22,66.447 64.22,63.62 63.725,63.125 63.725,61.4 v3(64.025,61.1)
  Layer 4 w0.4: v2(124.61,33.026) v2(124.611,34.624)
  Layer 4 w0.5: v3@119.15,45.075 119.225,45 119.275,45 123.45,40.825 126.175,40.825 v2(126.175,41.425)
  Layer 4 w1: v3@65.775,60.48 70.753,60.48 72.419,62.145 81.561,62.145 87.503,56.203 87.503,55.572 93.325,49.75 105.2,49.75 107.875,47.075 v3(107.875,45.65) 108.4,45.125 v3(118.375,45.125)
  Bottom Layer w0.2: v3(41.369,10.402) 42.027,10.402 42.515,10.89 C38.2@42.515,11.625
  Bottom Layer w0.4: R21.1@67.05,36.95 v4(68.5,36.95) R20.1@69.95,36.95 ; R196.2@115.575,46.35 117.846,46.35 118.346,45.85 v3(118.4,45.85) ; C136.2@119.914,21.026 v2(120.613,21.026) ; C132.2@120.611,22.686 v2(120.611,23.426) ; v2(123.011,21.824) C144.2@123.773,21.824 ; C133.2@125.423,20.372 v2(125.423,21.029) ; C75.2@126.215,23.595 v2@126.215,24.226 ; C69.2@127.69,35.475 127.81,35.595 v2(127.811,36.224)
  Bottom Layer w0.5: C136.2@119.858,21.082 C136.2@119.914,21.026 ; C132.2@120.519,22.686 C132.2@120.589,22.756 ; C144.2@123.773,21.824 C144.2@123.775,21.825 ; C133.2@125.335,20.275 C133.2@125.405,20.345 ; C75.2@126.215,23.595 C75.2@126.25,23.56
  other v2: 126.199,38.486 126.2,40.1
  other v3: 119.15,45.125 119.15,45.825 63.15,59.4 64.025,59.4 64.9,59.4 65.775,59.4 64.025,60.25 64.9,60.25 65.775,60.25 63.15,61.1 64.9,61.1 65.775,61.1
  other v4: 56.575,41.375
VDD_5V0: C4.2 C193.2 C197.1 DA3.3 DA3.5 DA3.6 L10.1 L59.1 L62.1 L66.2 L68.1 R44.2 R170.2 R190.1 R191.1 | length 157.6
  Top Layer w0.2: 52.6,60.1 52.65,60.15 R190.1@52.65,61.25
  Top Layer w0.25: C197.1@56.075,61.35 56.075,59.125 56.325,58.875 R191.1@56.95,58.875 ; v3@83.859,38.575 83.859,38.544 84.15,38.254 DA3.3@84.15,37.775
  Top Layer w0.3: L10.1@43.942,37.597 45.172,37.597 v4(45.65,38.075) ; R170.2@49.15,15.2 49.163,15.213 49.163,15.988 v3(49.175,16) ; v3(64.925,6.375) 64.94,6.36 64.94,5.603 R44.2@64.955,5.588 ; 84.15,35.25 DA3.5@84.15,35.925 ; v3(84.375,34.9) 84.55,35.075 84.55,35.45 84.65,35.55 DA3.6@84.65,35.925
  Top Layer w1: C193.2@51.3,60.1 52.6,60.1 54.5,60.1 55.75,61.35 C197.1@56.075,61.35
  Layer 4 w0.25: v3(83.85,38.575) 83.85,38.48 84.15,38.18 84.15,35.125 v3(84.375,34.9)
  Layer 4 w0.3: v4(45.65,38.075) 50.1,38.075 50.75,38.725 ; v3(49.175,16) 51.875,18.7 57.8,18.7 62.225,23.125 62.225,26 62.575,26.35 v4(63,26.35) ; v3(64.925,6.375) 64.925,26.375
  Layer 4 w1: v3(50.75,56.5) 50.75,38.725 63,26.475 v4(63,26.35) ; v3@51.425,57.45 52.475,57.45 52.75,57.175 52.75,39.275 63.775,28.25 77.65,28.25 v3@83.7,34.3
  other v3: 83.575,34.1 84.375,34.1 83.575,34.9 49.9,56.5 51.6,56.5 49.9,57.375 50.75,57.375 51.6,57.375 49.9,58.25 50.75,58.25 51.6,58.25 49.9,59.125 50.75,59.125 51.6,59.125
  other v4: 64.35,26.325 65.8,26.325 67.225,26.325 68.575,26.325
VMODE0: DD1.D5 R158.2 | length 13.8
  Top Layer w0.125: v2(123.85,46.2) 124.411,46.761 124.411,47.011 R158.2@124.575,47.175
  Top Layer w0.2: DD1.D5@121.812,35.025 v2(122.175,35.388)
  Layer 2 w0.125: v2(122.175,35.388) 121.812,35.75 121.812,36.789 122.387,37.364 122.387,42.714 122.162,42.939 122.162,44.186 123.85,45.874 v2(123.85,46.2)
VMODE1: DD1.E5 R159.2 | length 14.4
  Top Layer w0.125: v2(123.275,46.325) 123.625,46.675 R159.2@123.625,47.175
  Top Layer w0.2: DD1.E5@121.812,34.225 v2(122.213,34.626)
  Layer 2 w0.125: v2(122.213,34.626) 121.587,35.253 121.587,36.882 122.162,37.457 122.162,42.5 121.9,42.762 121.9,44.25 123.275,45.625 v2(123.275,46.325)
pads on no net: BQ1.2 BQ1.4 BQ2.2 BQ2.4 BQ3.2 BQ3.4 D3.6 D3.7 DA13.2 DA13.4 DA13.5 DA13.6 DA13.9 DA13.10 DA14.18 DA15.18 DA16.2 DA16.4 DA16.5 DA16.6 DA16.9 DA16.10 DA17.2 DA17.4 DA17.5 DA17.6 DA17.9 DA17.10 DA18.6 DA18.7 DA19.6 DA19.7 DA20.2 DA20.4 DA20.5 DA20.6 DA20.8 DA20.9 DA20.11 DA20.12 DA21.2 DA21.4 DA21.5 DA21.6 DA21.9 DA21.10 DD1.A7 DD1.A8 DD1.A11 DD1.AA1 DD1.AA2 DD1.AA3 DD1.AA8 DD1.AA9 DD1.AA18 DD1.B7 DD1.B9 DD1.B10 DD1.B11 DD1.C4 DD1.C7 DD1.C8 DD1.C10 DD1.C12 DD1.C13 DD1.D7 DD1.D8 DD1.D10 DD1.D12 DD1.D13 DD1.D15 DD1.E8 DD1.E9 DD1.E10 DD1.E13 DD1.E14 DD1.E15 DD1.E16 DD1.F8 DD1.F9 DD1.F12 DD1.F16 DD1.F17 DD1.F19 DD1.G6 DD1.G15 DD1.G16 DD1.G17 DD1.G19 DD1.G20 DD1.G21 DD1.H15 DD1.H17 DD1.H18 DD1.H19 DD1.H20 DD1.L11 DD1.L16 DD1.M1 DD1.M2 DD1.M12 DD1.N2 DD1.N3 DD1.N15 DD1.N19 DD1.N20 DD1.P1 DD1.P2 DD1.P15 DD1.P16 DD1.R1 DD1.R3 DD1.R6 DD1.R7 DD1.R15 DD1.R16 DD1.R19 DD1.T1 DD1.T2 DD1.T3 DD1.T4 DD1.T6 DD1.T17 DD1.T19 DD1.U1 DD1.U2 DD1.U5 DD1.U7 DD1.U9 DD1.U10 DD1.U12 DD1.U14 DD1.U19 DD1.V2 DD1.V10 DD1.V12 DD1.V15 DD1.W1 DD1.W2 DD1.W3 DD1.W10 DD1.W11 DD1.W12 DD1.W15 DD1.W17 DD1.W18 DD1.Y1 DD1.Y3 DD1.Y10 DD1.Y15 DD1.Y18 DD1.Y20 DD1.Y21 DD2.7 DD2.13 DD3.7 DD3.13 DD6.J1 DD6.J9 DD6.L1 DD6.L9 DD6.M7 DD7.13 DD7.43 DD7.47 DD12.62 DD12.63 DD12.65 DD12.66 DD13.15 DD14.3 DD14.6 DD14.15 DD14.22 DD16.1 DD16.2 DD16.3 DD16.4 DD16.5 DD16.9 DD16.11 DD16.13 DD16.14 DD16.15 DD16.16 DD16.17 DD16.18 DD16.19 DD16.21 DD16.22 DD16.23 DD16.24 DD16.26 DD16.37 DD16.38 DD16.41 DD16.42 DD16.45 DD16.46 DD16.47 DD16.48 DD17.6 DD17.7 DD17.8 DD17.12 DD17.15 DD17.23 DD18.22 DD18.23 DD18.24 DD18.26 DD18.27 DD18.28 DD18.29 DD18.30 DD18.32 DD18.33 DD18.34 DD18.36 DD18.40 DD18.41 DD18.43 DD18.44 DD18.45 DD18.46 DD18.48 DD18.52 DD18.53 DD18.54 DD18.55 DD18.57 DD18.58 DD18.60 G1.1 G3.2 G3.5 G3.7 G3.8 G3.10 T1.2 T2.2 VD1.2 VD2.2 VD3.4 XP3.0 XP4.0 XP7.3 XS1.0 XS3.6 XS3.7 XS3.8 XS3.9 XS3.10 Z1.2 Z1.3 Z1.6 Z1.7 Z4.1 Z4.2 Z4.7 Z4.8
copper on no net: | length 0.6
  Top Layer w0.2: 125.812,24.625 125.813,24.625 v2(126.213,25.024) v2(126.213,25.024)

## Polygon pours and split planes (outlines as drawn)
GND on Layer 4 "GND_L05_P003" (solid, remove dead copper, pour order 3): 0.05,71.98 0.055,71.975 203,71.975 203,0.05 202.95,0.1 0.05,0.1
ANALOG_3V8 on Layer 4 "ANALOG_3V8_L05_P000" (solid, pour order 0): 80.4,67.525 83.875,67.525 86.475,64.925 91.55,64.925 91.55,61.975 91.6,61.925 85,61.925 84.3,62.625 80.4,62.625
no net on Top Solder (solid): 202 vertices, not listed, extent 14.949,-0.2 194.75,72
no net on Bottom Solder (solid): 201 vertices, not listed, extent 14.949,-0.2 194.75,72
GND on Layer 3 "GND_L02_P004" (solid, remove dead copper, pour order 4): 0.05,71.98 0.055,71.975 203,71.975 203,0.05 202.95,0.1 0.05,0.1
GND on Bottom Layer "GND_L06_P002" (solid, remove dead copper, pour order 2): 0.05,71.98 0.055,71.975 203,71.975 203,0.05 202.95,0.1 0.05,0.1
GND on Top Layer "GND_L01_P001" (solid, remove dead copper, pour order 1): 0.05,71.98 0.055,71.975 203,71.975 203,0.05 202.95,0.1 0.05,0.1
GND on Layer 2 "GND_L04_P007" (solid, pour order 7): 32.05,72 32.05,48.725 139.575,48.725 139.575,72
GND on Layer 1 "GND_L03_P005" (solid, pour order 5): 31.65,72 31.65,48.725 139.575,48.725 139.575,72

## Keep-outs
Keep-Out Layer:
  the board outline again, w0.1

## Other copper
Top Layer:
  rectangle net VDD_5V0: 49.325,56.2 51.925,60.55
  rectangle net NetC311_2: 113.675,8.175 115.301,9.775
  rectangle net NetC311_2: 74.975,23.2 77.901,24.942
  rectangle net VDD_5V0: 80.5,33.8 84.7,35.425
  rectangle net VDD_5V0: 62.625,23.675 72.575,26.725
  rectangle net VCC_12V0: 53.15,64.3 54.85,66.1
  rectangle net ANALOG_3V8: 89.725,61.2 91.625,65.875
  rectangle net VDD_1V0: 88.55,38.45 91.65,44.45
  rectangle net CLK_3V3: 102.275,62.7 104.05,67.6
  rectangle net GND: 164.876,29.325 166.475,32.75
  rectangle net GND: 164.852,20.775 166.502,24.452
  rectangle net GND: 148.821,31.575 150.325,35.575
  rectangle net GND: 98.2,58.475 99.85,64.652
  rectangle net VDD_3V3: 118.05,44.75 119.475,46.225
  rectangle net VDD_3V3: 125.95,38.275 126.425,42.275
  rectangle net VDD_3V3: 62.725,59.075 67.375,61.925
  rectangle net VCC_12V0: 65.55,66.749 67.325,68.75
  rectangle net VCC_12V0: 40.55,55.602 44.15,62.377
  region net VCC_12V0: 62.057,58.6 62.057,56.9 64.232,56.9 64.232,58.6
  region net VCC_12V0: 78.375,58.3 76.675,58.3 76.675,56.125 78.375,56.125
  rectangle net VCC_12V0: 71.007,57.7 72.707,59.875
  rectangle net VCC_12V0: 98.55,45.35 100.275,46.55
  rectangle net DDR_1V5: 97.3,38.325 101.525,41.275
  rectangle net VDD_1V8: 57.757,49.225 62.407,52.3
  rectangle net VDD_2V5: 66.507,51.625 71.232,52.875
  rectangle net ANALOG_3V8: 81.725,62.625 85.2,67.525
  rectangle net NetL58_1: 36.55,57.55 38.7,64.325
  rectangle net CHP: 81.275,8.125 82.575,17.25
  rectangle net ANALOG_3V8: 133.9,54.35 135.325,55.825
  rectangle net ANALOG_3V8: 141.1,25.75 142.525,27.225
  rectangle net ANALOG_3V8: 155.15,26.35 156.3,32.175
  pour cut-out: 115.8,38 115.8,31 103.2,31 103.2,38
  pour cut-out: 118.3,37.85 135.7,37.85 135.7,20.25 118.3,20.25
  pour cut-out: 189.455,10.103 189.455,6.232 182.463,6.232 182.463,10.103
  pour cut-out: 190.405,31.503 190.405,27.632 183.413,27.632 183.413,31.503
  pour cut-out: 190.392,20.721 190.392,16.85 183.4,16.85 183.4,20.721
  pour cut-out: 163.618,50.952 169.018,50.952 169.018,41.265 163.618,41.265
  pour cut-out: 163.425,66.138 168.825,66.138 168.825,56.45 163.425,56.45
  pour cut-out: 177.53,46.836 184.73,46.836 184.73,42.885 177.53,42.885
  pour cut-out: 177.475,61.925 184.675,61.925 184.675,57.975 177.475,57.975
Layer 3:
  rectangle net NetC311_2: 76.188,23.187 77.887,24.988
  rectangle net NetC311_2: 113.587,8.062 115.287,9.862
  rectangle net VCC_12V0: 53.15,64.3 54.85,66.1
  rectangle net VDD_1V0: 90.15,41.325 91.65,44.45
  rectangle net CLK_3V3: 102.275,62.7 104.05,65.35
  rectangle net VDD_3V3: 118.05,44.75 119.475,46.225
  rectangle net VDD_3V3: 62.725,59.05 66.175,61.5
  rectangle net VCC_12V0: 65.625,67.025 67.325,68.825
  rectangle net VCC_12V0: 41.95,55.602 44.15,62.377
  region net VCC_12V0: 64.182,56.875 64.182,58.575 62.382,58.575 62.382,56.875
  rectangle net VCC_12V0: 71.007,58.075 72.707,59.875
  rectangle net VCC_12V0: 76.612,56.138 78.312,57.938
  rectangle net DDR_1V5: 97.3,38.325 101.725,40.15
  rectangle net VDD_2V5: 66.507,50.875 71.232,52.875
  rectangle net NetL58_1: 21.15,57.55 38.825,64.975
  pour cut-out: 190.423,31.521 190.423,27.65 183.431,27.65 183.431,31.521
  pour cut-out: 189.442,10.103 189.442,6.232 182.449,6.232 182.449,10.103
  pour cut-out: 190.392,20.8 190.392,16.85 183.4,16.85 183.4,20.8
  pour cut-out: 163.618,50.952 169.018,50.952 169.018,41.265 163.618,41.265
  pour cut-out: 163.425,66.138 168.825,66.138 168.825,56.45 163.425,56.45
  pour cut-out: 177.53,46.836 184.73,46.836 184.73,42.885 177.53,42.885
  pour cut-out: 177.475,61.925 184.675,61.925 184.675,57.975 177.475,57.975
Layer 1:
  pour cut-out: 190.405,31.503 190.405,27.632 183.413,27.632 183.413,31.503
  pour cut-out: 189.442,10.103 189.442,6.232 182.449,6.232 182.449,10.103
  pour cut-out: 190.392,20.8 190.392,16.85 183.4,16.85 183.4,20.8
  pour cut-out: 163.618,50.952 169.018,50.952 169.018,41.265 163.618,41.265
  pour cut-out: 163.425,66.138 168.825,66.138 168.825,56.45 163.425,56.45
  pour cut-out: 177.53,46.836 184.73,46.836 184.73,42.885 177.53,42.885
  pour cut-out: 177.475,61.925 184.675,61.925 184.675,57.975 177.475,57.975
Layer 2:
  pour cut-out: 190.405,31.503 190.405,27.632 183.413,27.632 183.413,31.503
  pour cut-out: 189.442,10.103 189.442,6.232 182.449,6.232 182.449,10.103
  pour cut-out: 190.392,20.8 190.392,16.85 183.4,16.85 183.4,20.8
  pour cut-out: 163.618,50.952 169.018,50.952 169.018,41.265 163.618,41.265
  pour cut-out: 163.425,66.138 168.825,66.138 168.825,56.45 163.425,56.45
  pour cut-out: 177.53,46.836 184.73,46.836 184.73,42.885 177.53,42.885
  pour cut-out: 177.475,61.925 184.675,61.925 184.675,57.975 177.475,57.975
Layer 4:
  rectangle net VDD_5V0: 83.2,33.8 84.7,35.25
  rectangle net VDD_5V0: 49.575,56.2 51.925,59.425
  rectangle net VDD_5V0: 62.075,25.85 68.975,26.725
  rectangle net VDD_3V3: 62.725,59.025 66.25,61.5
  rectangle net ANALOG_3V8: 89.725,63.9 91.635,65.875
  rectangle net VDD_3V3: 118.05,44.75 119.475,46.225
  rectangle net VDD_3V3: 125.95,36.798 126.425,42.275
  rectangle net VCC_12V0: 76.65,56.175 78.35,57.975
  rectangle net ANALOG_3V8: 81.875,63.525 85.3,67.525
  rectangle net VDD_1V8: 57.757,49.225 62.407,52
  rectangle net ANALOG_3V8: 133.9,54.35 135.325,55.825
  rectangle net ANALOG_3V8: 141.1,25.75 142.525,27.225
  rectangle net ANALOG_3V8: 155.175,26.75 156.325,31.775
  pour cut-out: 190.405,31.503 190.405,27.632 183.413,27.632 183.413,31.503
  pour cut-out: 189.455,10.103 189.455,6.232 182.463,6.232 182.463,10.103
  pour cut-out: 190.392,20.8 190.392,16.85 183.4,16.85 183.4,20.8
  pour cut-out: 163.618,50.952 169.018,50.952 169.018,41.265 163.618,41.265
  pour cut-out: 163.425,66.138 168.825,66.138 168.825,56.45 163.425,56.45
  pour cut-out: 177.53,46.836 184.73,46.836 184.73,42.885 177.53,42.885
  pour cut-out: 177.475,61.925 184.675,61.925 184.675,57.975 177.475,57.975
Bottom Layer:
  rectangle net CLK_3V3: 102.275,62.7 104.05,65.35
  pour cut-out: 190.405,31.503 190.405,27.632 183.413,27.632 183.413,31.503
  pour cut-out: 189.442,10.103 189.442,6.232 182.449,6.232 182.449,10.103
  pour cut-out: 190.392,20.8 190.392,16.85 183.4,16.85 183.4,20.8
  pour cut-out: 163.618,50.952 169.018,50.952 169.018,41.265 163.618,41.265
  pour cut-out: 163.425,66.138 168.825,66.138 168.825,56.45 163.425,56.45
  pour cut-out: 177.53,46.836 184.73,46.836 184.73,42.885 177.53,42.885
  pour cut-out: 177.475,61.925 184.675,61.925 184.675,57.975 177.475,57.975

## Silkscreen, mask and mechanical layers (free items; w line width, h text height)
Top Overlay:
  text "+3V8" at 75.529,66.641 h1.52
  text "RX" at 196.679,65.004 h1.52
  text "+12V" at 28.621,60.129 h1.52 r90
  text "+3V3" at 59.279,59.679 h1.52
  text "+5V0" at 47.904,53.479 h1.52
  text "RXFB" at 195.579,49.529 h1.52
  text "+2V5" at 71.754,47.504 h1.52
  text "+1V8" at 56.479,47.254 h1.52
  text "+1V5" at 93.929,47.254 h1.52
  text "+1V0" at 86.229,45.179 h1.52
  text "TX" at 197.204,23.854 h1.52
  text "+1V2" at 47.579,17.029 h1.52
  text "SPK" at 89.421,3.904 h1.52 r90
Top Solder:
  lines w3: 192.6,2.95 193,3.35
Экран:
  lines w0.2: 16.335,16.653 ccw(c17.2,14.85) 15.2,14.85 15.2,0 86.077,0 ccw(c85,2.8) 87.277,4.754 ; 16.347,16.662 ccw(c15.2,18.3) 17.2,18.3 17.2,59 29.2,59 ; 18.2,7.2 ccw(c20.2,7.2) 19.355,5.387 ; 18.21,7.2 18.204,13.365 cw(c20.097,13.365) 19.011,14.916 ; 19.065,14.947 ccw(c18.2,16.75) 20.2,16.75 20.2,54 cw(c22.2,54) 22.2,56 34.2,56 34.2,64.8 cw(c36.2,64.8) 35.355,66.613 ; 19.15,15.004 19.2,15.032 ; 19.326,5.402 cw(c18,2.8) 20.578,4.171 ; 20.587,4.155 ccw(c22.4,5) 22.4,3 ; 22.259,3 80.5,3 ccw(c80.5,6) 83.5,6 83.5,10.5 cw(c89.5,10.5) 89.5,16.5 ; 29.1,59 ccw(c29.1,61) 31.1,61 31.1,72 194.8,72 194.8,0 146.719,0 ; 35.371,66.622 ccw(c34,69.2) 36.602,67.874 ; 36.587,67.845 cw(c38.4,67) 38.4,69 83,69 cw(c83,66) 86,66 86,54.97 cw(c83,54.97) 85.215,52.947 ; 85.232,52.963 ccw(c87.5,51) 89.359,48.645 ; 87.268,4.746 cw(c89.5,6.75) 86.5,6.75 86.5,10.5 cw(c89.5,10.5) 89.5,13.5 143.5,13.5 cw(c143.5,10.5) 146.5,10.5 146.5,6.77 cw(c143.5,6.77) 145.715,4.747 ; 89.214,48.533 cw(c91.056,46.259) 91.056,49.185 127.03,49.494 ; 89.375,16.5 143.5,16.5 cw(c143.5,10.5) 149.5,10.5 149.5,6 ccw(c152.5,6) 152.5,3 168,3 ccw(c168,6) 171,6 171,34.109 ccw(c168,34.109) 168,37.109 ; 92,52.3 cw(c92,55.3) 89,55.3 89,66 cw(c92,66) 92,69 126.5,69 cw(c126.5,66) 129.5,66 129.5,55.5 cw(c126.5,55.5) 126.5,52.5 ; 92,52.306 126.5,52.487 ; 127.03,49.5 cw(c127.03,46.5) 129.053,48.715 ; 129.037,48.732 ccw(c131,51) 133.231,53.005 ; 133.235,53.008 cw(c135.5,54.975) 132.5,54.975 132.5,66 cw(c135.5,66) 135.5,69 156.5,69 cw(c156.5,66) 159.5,66 159.5,57.15 cw(c156.5,57.15) 158.68,55.089 ; 145.732,4.763 ccw(c148,2.8) 146.719,0.087 ; 158.674,55.095 ccw(c161,53.2) 158.687,51.29 ; 158.694,51.297 cw(c156.5,49.25) 159.5,49.222 ; 158.715,40.547 ccw(c156.5,42.57) 159.5,42.57 159.5,49.222 ; 158.732,40.563 ccw(c161,38.6) 163.005,36.369 ; 163.008,36.365 cw(c164.975,34.1) 164.975,37.1 168,37.1 ; 177,37.1 188.8,37.1 cw(c188.8,34.1) 191.8,34.1 191.8,7.225 ; 177,37.109 ccw(c177,34.109) 174,34.109 174,6 ccw(c177,6) 177,3 187.6,3 ccw(c187.6,5) 189.413,4.155 ; 189.398,4.126 cw(c192,2.8) 190.629,5.378 ; 189.413,67.845 ccw(c187.6,67) 187.6,69 165.5,69 ccw(c165.5,66) 162.5,66 162.5,57.7 ccw(c165.5,57.7) 165.5,54.7 188.8,54.7 ccw(c188.8,57.7) 191.8,57.7 191.8,64.8 ccw(c189.8,64.8) 190.645,66.613 ; 189.422,67.829 ccw(c192,69.2) 190.674,66.598 ; 190.645,5.387 ccw(c189.8,7.2) 191.8,7.2 ; 162.5,43.1 ccw(c165.5,43.1) 165.5,40.1 188.8,40.1 ccw(c188.8,43.1) 191.8,43.1 191.8,48.7 ccw(c188.8,48.7) 188.8,51.7 165.5,51.7 ccw(c165.5,48.7) 162.5,48.7 162.5,43.1